# Altium PCB SyncBoard1.PcbDoc (part 2 of 4)
Units mm, origin at the board's own origin, x right, y up, seen from the top; angles counter-clockwise.
Board outline 300 x 250 mm, 2 copper layers (Top Layer, Bottom Layer); 311 components, 299 nets, 1572 pads, 3310 vias.
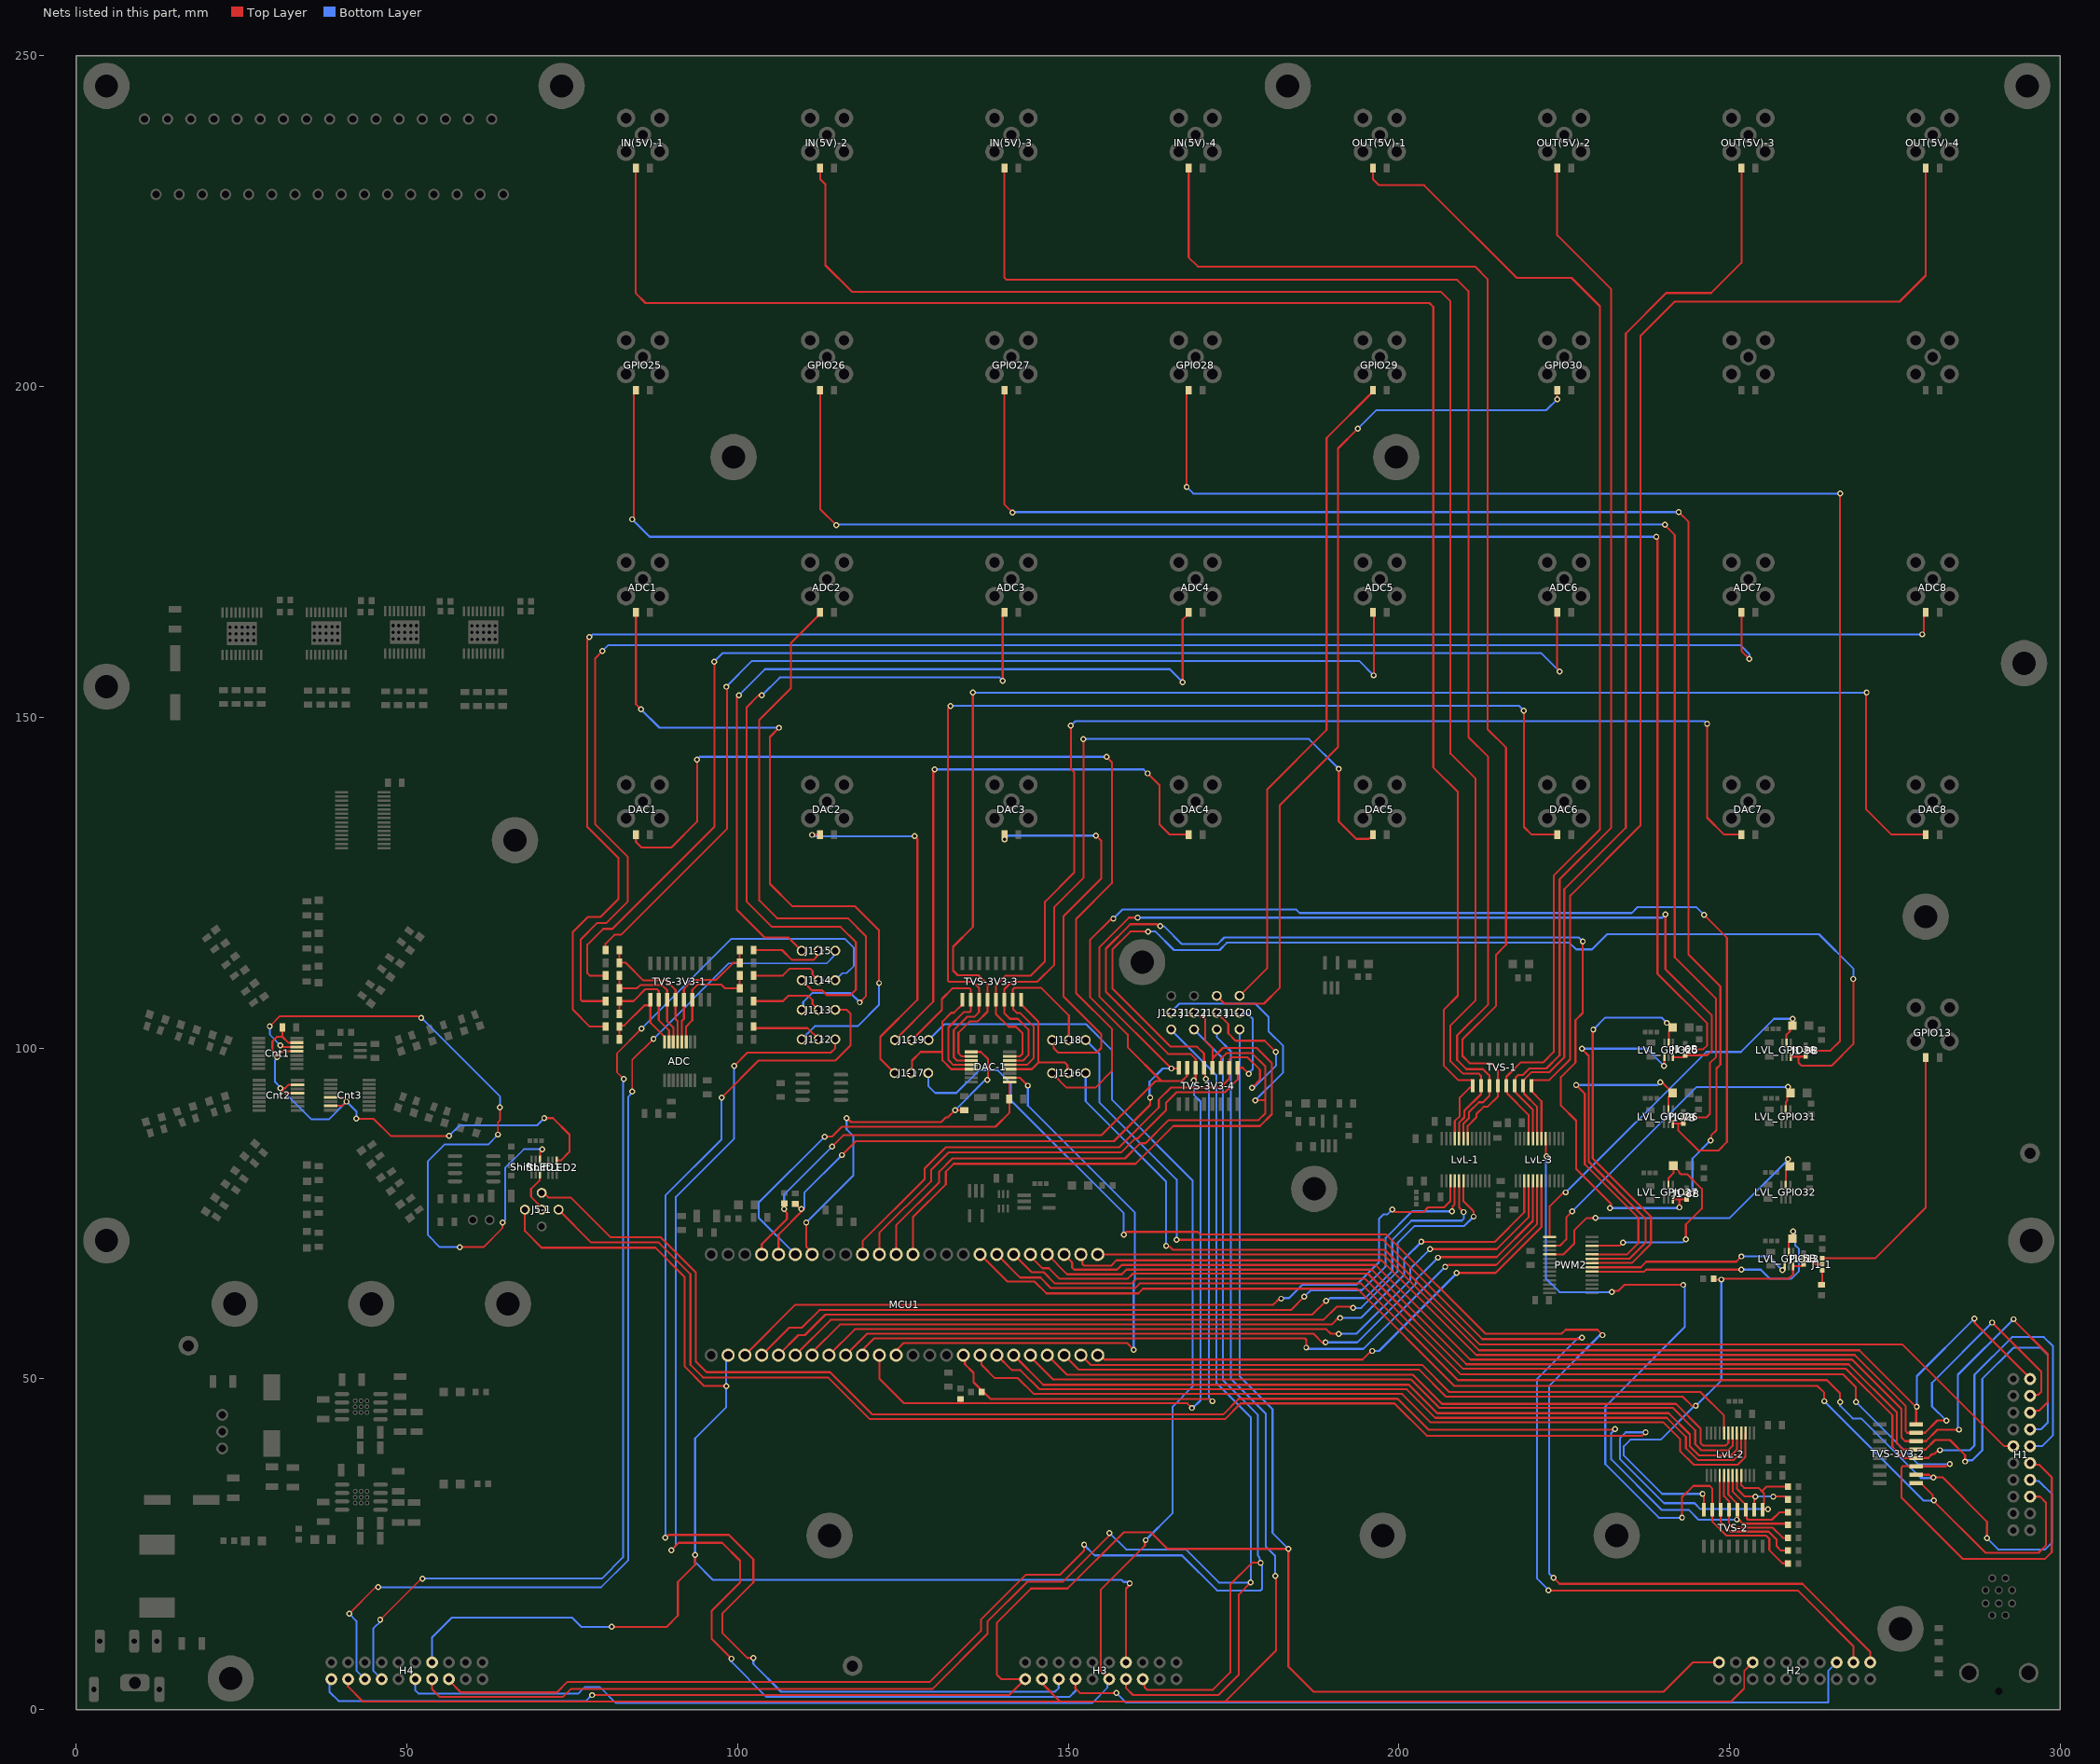
[diagram p2: the nets of this part, all layers, seen from the top]

## Via types
v1: diameter 0.9, hole 0.5, Top Layer to Bottom Layer, tented both sides, 3146 vias
v2: diameter 1.27, hole 0.711, Top Layer to Bottom Layer, tented both sides, 164 vias

## Nets (pads, with @x,y where several pads share a name; then routed paths per layer and width w, separated by ;. In a path a pad name is that pad's centre, name@x,y a point inside that pad or via, vN(x,y) a via of type N, cw(c..) or ccw(c..) an arc to the next point about the centre after c; other vN are vias at no path point) (continued)
AD_3: ADC.3 C5-3.2 R5-3.2 TVS-3V3-1.14 | length 17.9
  Top Layer w0.3: ADC.3@92.246,100.9 92.246,103.246 93.176,104.176 TVS-3V3-1.14@93.176,107.3 93.176,108.776 94,109.6 97.5,109.6 98.086,109.014 C5-3.2@100.346,109.014 R5-3.2@100.346,110.943
AD_4: ADC.4 C5-4.2 R5-4.2 TVS-3V3-1.13 | length 20.1
  Top Layer w0.3: ADC.4@91.596,100.9 91.596,104.096 91.906,104.406 TVS-3V3-1.13@91.906,107.3 91.906,108.906 93.3,110.3 96.8,110.3 99.371,112.871 C5-4.2@100.346,112.871 R5-4.2@100.346,114.8
AD_5: ADC.5 C5-5.2 R5-5.2 TVS-3V3-1.12 | length 20.1
  Top Layer w0.3: R5-5.2@82.146,114.8 C5-5.2@82.146,112.871 83.129,112.871 85.8,110.2 89.2,110.2 90.636,108.764 TVS-3V3-1.12@90.636,107.3 90.636,104.364 90.946,104.054 ADC.5@90.946,100.9
AD_6: ADC.6 C5-6.2 R5-6.2 TVS-3V3-1.11 | length 17.9
  Top Layer w0.3: R5-6.2@82.146,110.943 C5-6.2@82.146,109.014 84.814,109.014 85.3,109.5 88.6,109.5 89.366,108.734 TVS-3V3-1.11@89.366,107.3 89.366,104.034 90.296,103.104 ADC.6@90.296,100.9
AD_7: ADC.7 C5-7.2 R5-7.2 TVS-3V3-1.10 | length 17.1
  Top Layer w0.3: C5-7.2@82.146,105.157 R5-7.2@82.146,107.086 84.286,107.086 86.1,108.9 87.8,108.9 88.096,108.604 TVS-3V3-1.10@88.096,107.3 88.096,104.204 89.646,102.654 ADC.7@89.646,100.9
AD_8: ADC.8 C5-8.2 R5-8.2 TVS-3V3-1.9 | length 15.3
  Top Layer w0.3: C5-8.2@82.146,101.3 R5-8.2@82.146,103.229 82.317,103.4 82.9,103.4 85.95,106.45 86.676,106.45 TVS-3V3-1.9@86.826,106.6 ; TVS-3V3-1.9@86.826,107.3 TVS-3V3-1.9@86.826,106.6 ; ADC.8@88.996,100.9 88.996,101.675 86.826,103.845 TVS-3V3-1.9@86.826,106.6
ADC_1: J1-12.2 R5-1.1 | length 10.6
  Top Layer w0.3: R5-1.1@102.446,103.229 102.675,103 110.6,103 112.246,101.354 J1-12.2@112.246,101.3
ADC_1_E: H2.18 H3.7 J1-12.3 | length 304.2
  Top Layer w0.3: v1(90,24.1) 91.1,25.2 97.7,25.2 100.4,22.5 100.4,19.2 96.1,14.9 96.1,10.7 v1(99.1,7.7) ; v1(99.5,97.3) 101.5,99.3 114.1,99.3 114.786,99.986 J1-12.3@114.786,101.3 ; H3.7@151.12,4.6 151.1,4.58 151.1,3.2 151.8,2.5 v1(157.3,2.5)
  Bottom Layer w0.254: 264.9,5.86 H2.18@266.18,7.14 ; 264.91,3.4 264.91,5.86
  Bottom Layer w0.3: v1(90,24.1) 90.7,24.8 90.7,77.5 99.5,86.3 v1(99.5,97.3) ; v1(99.1,7.7) 99,7.6 99,7.3 104.4,1.9 150.182,1.9 151.12,2.838 H3.7@151.12,4.6 ; v1(157.3,2.5) 158.7,1.1 264.9,1.1 264.9,3.4
ADC_1_S: ADC1.1 J1-12.1 | length 105.7
  Top Layer w0.3: ADC1.1@84.65,165.831 84.65,151.95 v1(85.4,151.2) ; v1(106.3,148.4) 104.9,147 104.9,124.8 108.3,121.4 117.8,121.4 121.4,117.8 v1(121.4,109.8)
  Bottom Layer w0.3: v1(85.4,151.2) 88.2,148.4 v1(106.3,148.4) ; J1-12.1@109.706,101.3 111.706,103.3 118.2,103.3 121.4,106.5 v1(121.4,109.8)
ADC_2: J1-13.2 R5-2.1 | length 11.4
  Top Layer w0.3: R5-2.1@102.446,107.086 106.886,107.086 107.7,107.9 110.7,107.9 111.358,107.242 111.358,106.654 J1-13.2@112.246,105.767
ADC_2_E: H3.8 J1-13.3 | length 184.8
  Top Layer w0.3: v1(89.1,26) 89.176,26 89.576,26.4 98.7,26.4 102.4,22.7 102.4,19.2 97.7,14.5 97.7,11.6 101.5,7.8 v1(102.4,7.8) ; v1(97.6,92.5) 103.2,98.1 114.8,98.1 117.1,100.4 117.1,105.2 116.533,105.767 J1-13.3@114.786,105.767
  Bottom Layer w0.3: v1(89.1,26) 89.1,77.7 97.6,86.2 v1(97.6,92.5) ; v1(102.4,7.8) 102.4,6.9 106.6,2.7 148,2.7 148.55,3.25 148.55,4.57 H3.8@148.58,4.6
ADC_2_S: ADC2.1 J1-13.1 | length 87
  Top Layer w0.3: ADC2.1@112.507,165.831 112.507,165.631 108.1,161.224 108.1,154.4 103.3,149.6 103.3,122.3 106,119.6 116.7,119.6 119.4,116.9 119.4,107.8 v1(118.5,106.9)
  Bottom Layer w0.3: J1-13.1@109.706,105.767 109.936,105.996 109.936,106.936 111.3,108.3 117.1,108.3 v1(118.5,106.9)
ADC_3: J1-14.2 R5-3.1 | length 11.3
  Top Layer w0.3: R5-3.1@102.446,110.943 106.843,110.943 107.9,112 111,112 111.358,111.642 111.358,111.121 J1-14.2@112.246,110.233
ADC_3_E: H4.7 J1-14.3 | length 177.2
  Top Layer w0.254: v1(46,13.6) 52.2,19.8 v1(52.4,19.8) ; v1(82.8,95.3) 81.8,96.3 81.8,99.2 v1(85.5,102.9)
  Bottom Layer w0.254: 44.958,5.827 44.958,12.293 ; 44.993,5.827 H4.7@46.22,4.6 ; 44.993,12.293 46.1,13.4 46.1,13.5 v1(46,13.6) ; v1(52.4,19.8) 79.5,19.8 82.7,23 82.7,95.2 v1(82.8,95.3) ; v1(85.5,102.9) 99.1,116.5 116.2,116.5 117.6,115.1 117.6,112.4 116.5,111.3 115.853,111.3 J1-14.3@114.786,110.233
ADC_3_S: ADC3.1 J1-14.1 | length 116.3
  Top Layer w0.3: v1(103.7,153.3) 103.2,153.3 101.4,151.5 101.4,122.1 105.2,118.3 115.6,118.3 117.9,116 117.9,108.8 117.1,108 113.5,108 112.8,108.7 111.239,108.7 J1-14.1@109.706,110.233 ; v1(140.1,155.5) 140.1,165.566 ADC3.1@140.364,165.831
  Bottom Layer w0.3: v1(103.7,153.3) 106.4,156 139.6,156 v1(140.1,155.5)
ADC_4: J1-15.2 R5-4.1 | length 11.4
  Top Layer w0.3: R5-4.1@102.446,114.8 106.736,114.8 108.236,113.3 111.5,113.3 112.024,113.824 112.024,114.478 J1-15.2@112.246,114.7
ADC_4_E: H4.8 J1-15.3 | length 170.2
  Top Layer w0.254: v1(41.3,14.5) 45.3,18.5 v1(45.7,18.5) ; v1(84.1,93.4) 84.1,98.2 v1(87.3,101.4)
  Bottom Layer w0.254: v1(41.3,14.5) 42.4,13.4 42.4,5.88 H4.8@43.68,4.6 ; v1(45.7,18.5) 79.4,18.5 83.5,22.6 83.5,88.6 83.5,92.645 84.1,93.245 v1(84.1,93.4) ; v1(87.3,101.4) 98.7,112.8 113.5,112.8 114.548,113.848 114.548,114.462 J1-15.3@114.786,114.7
ADC_4_S: ADC4.1 J1-15.1 | length 125.4
  Top Layer w0.3: v1(100.2,153.3) 99.9,153 99.9,120.9 104.1,116.7 107.706,116.7 J1-15.1@109.706,114.7 ; v1(167.3,155.3) 167.3,164.709 168.221,165.631 ADC4.1@168.221,165.831
  Bottom Layer w0.3: v1(100.2,153.3) 104.15,157.25 165.35,157.25 v1(167.3,155.3)
ADC_5: ADC5.1 R5-5.1 | length 158
  Top Layer w0.3: R5-5.1@80.046,114.8 80.046,115.746 81.4,117.1 82.4,117.1 98.4,133.1 98.4,154.5 v1(98.3,154.6) ; ADC5.1@196.079,165.831 196.2,165.709 v1(196.2,156.3)
  Bottom Layer w0.3: v1(98.3,154.6) 102.2,158.5 194,158.5 v1(196.2,156.3)
ADC_6: ADC6.1 R5-6.1 | length 197.3
  Top Layer w0.3: R5-6.1@80.046,110.943 77.657,110.943 77.3,111.3 77.3,115.6 79.7,118 81.1,118 96.5,133.4 v1(96.5,158.4) ; ADC6.1@223.936,165.831 223.936,157.427 224.3,157.062 v1(224.3,156.9)
  Bottom Layer w0.3: v1(96.5,158.4) 97.8,159.7 221.5,159.7 v1(224.3,156.9)
ADC_7: ADC7.1 R5-7.1 | length 245.4
  Top Layer w0.3: v1(79.6,160) 78.5,158.9 78.5,133.8 83.4,128.9 83.4,122.1 80.2,118.9 78.8,118.9 76.314,116.414 76.314,107.261 76.49,107.086 R5-7.1@80.046,107.086 ; ADC7.1@251.793,165.831 251.793,160.007 v1(253,158.8)
  Bottom Layer w0.3: v1(79.6,160) 80.5,160.9 251.6,160.9 253,159.5 v1(253,158.8)
ADC_8: ADC8.1 R5-8.1 | length 273.6
  Top Layer w0.3: v1(77.6,162.1) 77.3,161.8 77.3,133.4 82,128.7 82,122.5 79.3,119.8 77.4,119.8 75.1,117.5 75.1,105.8 77.671,103.229 R5-8.1@80.046,103.229 ; v1(279.1,162.5) 279.1,162.662 279.35,162.912 279.35,165.531 ADC8.1@279.65,165.831
  Bottom Layer w0.3: v1(77.6,162.1) 77.676,162.1 78.076,162.5 v1(279.1,162.5)
Ain0: GPIO29.1 J1-20.3 | length 99.9
  Top Layer w0.3: J1-20.3@175.913,107.88 180.1,112.067 180.1,139.1 189.066,148.066 189.066,192.202 196.079,199.215 GPIO29.1@196.079,199.415
Ain1: GPIO30.1 J1-21.3 | length 133.8
  Top Layer w0.3: J1-21.3@172.468,107.88 173.648,106.7 179.6,106.7 182,109.1 182,136.7 190.8,145.5 190.8,190.6 v1(193.8,193.6) ; v1(223.936,198.036) GPIO30.1@223.936,199.415
  Bottom Layer w0.3: v1(193.8,193.6) 196.6,196.4 222.3,196.4 v1(223.936,198.036)
Cnt_In: J5-1.1 ShiftLED1.3 | length 6.6
  Top Layer w0.3: ShiftLED1.3@70.15,80.9 70.125,80.875 70.125,80.025 68.8,78.7 68.8,77.5 J5-1.1@70.7,75.6
Cnt_Reset: Cnt1.13 Cnt1.15 Cnt2.13 Cnt2.15 Cnt3.13 Cnt3.15 R1-32.1 ShiftLED2.4 | length 84.7
  Top Layer w0.3: v1(30.389,98.611) v1@30.389,98.911 ; R1-32.1@31.2,103.1 31.2,101.7 ; Cnt1.13@33.4,99.5 31.2,99.5 30.611,98.911 v1@30.389,98.911 ; Cnt1.15@33.4,100.8 32.1,100.8 31.2,101.7 ; Cnt2.13@33.5,93.15 31.65,93.15 v1(30.9,93.9) 31.6,93.9 32.15,94.45 Cnt2.15@33.5,94.45 ; Cnt3.15@38.5,91.25 40.25,91.25 v1(40.9,91.9) 40.25,92.55 Cnt3.13@38.5,92.55 ; v1(42.4,89.3) 45,89.3 47.6,86.7 v1(56.4,86.7) ; v1(70.8,89.4) 72.1,89.4 74.6,86.9 74.6,84.3 73.3,83 ShiftLED2.4@72.7,83 ; v1@30.389,98.911 29.7,99.6 29.7,101 30.4,101.7 31.2,101.7
  Bottom Layer w0.3: v1(30.389,98.611) 30.389,98.448 30.1,98.159 30.1,94.862 30.9,94.062 v1(30.9,93.9) 35.6,89.2 38.2,89.2 v1(40.9,91.9) 42.4,90.4 v1(42.4,89.3) ; v1(56.4,86.7) 58,88.3 69.7,88.3 v1(70.8,89.4)
Count: Cnt1.14 ShiftLED1.4 | length 107
  Top Layer w0.254: v1(29.3,103.3) 30.8,104.8 51.7,104.8 v1@52.2,104.3 ; v1(30.9,100.4) 31.075,100.4 31.325,100.15 Cnt1.14@33.4,100.15 ; v1(58,69.9) 61.6,69.9 64.469,72.769 64.469,73.569 v1(64.5,73.6) ; v1(63.8,86.9) 63.8,88.738 64.1,89.038 v1(64.1,91) ; ShiftLED1.4@70.15,83.1 70.15,84.35 v1(70.5,84.7)
  Bottom Layer w0.254: v1(29.3,103.3) 29.3,102 v1(30.9,100.4) ; v1@52.2,104.3 52.3,104.2 52.6,104.2 64.1,92.7 v1(64.1,91) ; v1(58,69.9) 55,69.9 53.2,71.7 53.2,82.9 55.7,85.4 62.3,85.4 v1(63.8,86.9) ; v1(64.5,73.6) 64.9,74 64.9,81.9 67.7,84.7 v1(70.5,84.7)
  other v1: 52.2,104.55
CS0: DAC-1.2 MCU1.11 | length 87.5
  Top Layer w0.3: MCU1.11@123.986,53.56 124.311,53.885 124.311,54.611 125.1,55.4 158.9,55.4 v1(159.9,54.4) ; DAC-1.2@141.146,95.5 142.7,95.5 v1(143.9,94.3)
  Bottom Layer w0.3: v1(143.9,94.3) 143.9,91.3 160.1,75.1 160.1,64.981 159.9,64.781 v1(159.9,54.4)
CS1: H3.17 H4.17 J5-1.5 MCU1.1 | length 217.6
  Top Layer w0.3: J5-1.5@67.86,75.56 67.86,72.34 70.39,69.81 87.59,69.81 91.99,65.41 91.99,51.89 94.98,48.9 v1(98.3,48.9) ; v1(81,12.5) 89.3,12.5 91,14.2 91,19.3 93.6,21.9 v1(93.6,23.4) ; H3.17@158.74,7.14 158.74,18.278 159.3,18.838 v1(159.3,19.1)
  Bottom Layer w0.3: H4.17@53.84,7.14 53.84,10.94 56.8,13.9 75,13.9 76.4,12.5 v1(81,12.5) ; MCU1.1@98.586,53.56 98.3,53.274 v1(98.3,48.9) 98.3,45.7 93.6,41 93.6,22.3 96.3,19.6 158.065,19.6 158.379,19.286 159.114,19.286 v1(159.3,19.1)
D0: IN(5V)-1.1 LvL-1.21 TVS-1.9 | length 272.8
  Top Layer w0.3: 84.65,233 84.6,232.95 84.6,214.1 86.1,212.6 204.6,212.6 205.2,212 205.2,142.4 208.9,138.7 208.9,107.9 206.8,105.8 206.8,97.3 208.95,95.15 211,95.15 211.15,95 TVS-1.9@211.15,94.3 211.15,94.15 211,94 210.7,94 209.2,92.5 209.2,89.7 208.45,88.95 LvL-1.21@208.45,86.3
d0*: LvL-1.3 MCU1.2 | length 122.8
  Top Layer w0.3: MCU1.2@101.126,53.56 108.766,61.2 181,61.2 181.583,61.783 181.62,61.783 181.927,62.09 v1@181.927,62.127 ; v1(198.98,75.57) 199.086,75.57 199.456,75.2 203.7,75.2 204.4,75.9 206.8,75.9 207.8,76.9 LvL-1.3@207.8,79.9
  Bottom Layer w0.3: v1@182.6,62.2 183.4,62.2 185.4,64.2 193.6,64.2 197,67.6 197,74.2 197.628,74.828 198.238,74.828 v1(198.98,75.57)
  other v1: 182.2,62.1
D1: IN(5V)-2.1 LvL-1.20 TVS-1.10 | length 246.2
  Top Layer w0.3: 112.507,233 112.507,231.293 113.3,230.5 113.3,218.3 117.3,214.3 206.348,214.3 207.8,212.848 207.8,144.5 211.6,140.7 211.6,107.2 207.8,103.4 207.8,98 209.7,96.1 212.1,96.1 212.42,95.78 TVS-1.10@212.42,94.3 212.42,93.02 209.9,90.5 209.9,89.5 209.1,88.7 LvL-1.20@209.1,86.3
d1*: LvL-1.4 MCU1.3 | length 120.6
  Top Layer w0.3: MCU1.3@103.666,53.56 107.806,57.7 109.7,57.7 112.389,60.389 183.689,60.389 v1(185.7,62.4) ; v1(208,75.3) 208.115,75.415 208.115,76.04 208.425,76.35 208.425,79.875 LvL-1.4@208.45,79.9
  Bottom Layer w0.3: v1(185.7,62.4) 186.7,63.4 194.4,63.4 198,67 198,71.3 202,75.3 v1(208,75.3)
D2: IN(5V)-3.1 LvL-1.19 TVS-1.11 | length 224.4
  Top Layer w0.3: 140.364,233 140.364,216.4 140.664,216.1 208.8,216.1 210.5,214.4 210.5,147 213.5,144 213.5,106.6 208.8,101.9 208.8,98.2 210.2,96.8 212.7,96.8 213.69,95.81 TVS-1.11@213.69,94.3 213.69,92.79 212.7,91.8 212.1,91.8 210.6,90.3 210.6,89.4 209.75,88.55 LvL-1.19@209.75,86.3 LvL-1.19@209.725,86.325
d2*: LvL-1.5 MCU1.4 | length 120.9
  Top Layer w0.3: MCU1.4@106.206,53.56 106.206,53.606 109.2,56.6 110.2,56.6 113.3,59.7 186.9,59.7 v1(189,61.8) ; LvL-1.5@209.1,79.9 209.1,75.9 v1(209.8,75.2)
  Bottom Layer w0.3: v1(189,61.8) 189.2,61.8 189.6,62.2 194.9,62.2 199,66.3 199,71 201.9,73.9 209.5,73.9 209.8,74.2 v1(209.8,75.2)
D3: IN(5V)-4.1 LvL-1.18 TVS-1.12 | length 200.1
  Top Layer w0.3: 168.221,233 168.221,219.479 169.6,218.1 211.5,218.1 213.4,216.2 213.4,148.2 216.2,145.4 216.2,115.6 214.7,114.1 214.7,106.4 209.6,101.3 209.6,98.8 210.7,97.7 213.8,97.7 214.96,96.54 TVS-1.12@214.96,94.3 214.96,92.66 213.4,91.1 212.8,91.1 211.7,90 211.7,89.5 210.4,88.2 LvL-1.18@210.4,86.3
d3*: LvL-1.6 MCU1.5 | length 120
  Top Layer w0.3: MCU1.5@108.746,53.56 114.086,58.9 188.6,58.9 190.6,60.9 192.9,60.9 v1(193.1,60.7) ; LvL-1.6@209.75,79.9 209.75,76.85 211.3,75.3 v1(211.3,74.5)
  Bottom Layer w0.3: v1(193.1,60.7) 194.3,60.7 199.8,66.2 199.8,70.5 202.4,73.1 209.9,73.1 v1(211.3,74.5)
D4: LvL-3.21 OUT(5V)-1.1 TVS-1.13 | length 179
  Top Layer w0.3: 196.079,233 196.079,231.321 197,230.4 203.8,230.4 217.8,216.4 226.1,216.4 230.4,212.1 230.4,133.021 223.4,126.021 223.4,99.4 221.8,97.8 218.4,97.8 216.23,95.63 TVS-1.13@216.23,94.3 216.38,94.15 216.38,93.12 219.6,89.9 LvL-3.21@219.6,86.3
d4*: LvL-3.3 MCU1.6 | length 123
  Top Layer w0.3: MCU1.6@111.286,53.56 111.286,53.986 115.5,58.2 189.839,58.2 190.839,59.2 v1(191.1,59.2) ; v1(203.4,70.7) 214.5,70.7 218.95,75.15 LvL-3.3@218.95,79.9
  Bottom Layer w0.3: v1(191.1,59.2) 194.3,59.2 200.8,65.7 200.8,68.1 v1(203.4,70.7)
D5: LvL-3.20 OUT(5V)-2.1 TVS-1.14 | length 159.2
  Top Layer w0.3: LvL-3.20@220.25,86.3 220.25,90.65 217.65,93.25 217.65,94.15 TVS-1.14@217.5,94.3 217.65,94.45 217.65,95.55 218,95.9 218.7,95.9 219.7,96.9 222.3,96.9 224.3,98.9 224.3,125.5 232.1,133.3 232.1,214.676 223.936,222.84 223.936,233
d5*: LvL-3.4 MCU1.7 | length 121.5
  Top Layer w0.3: MCU1.7@113.826,53.56 117.766,57.5 189,57.5 189.7,56.8 v1(190.9,56.8) ; v1(204.7,69.6) 214.8,69.6 219.6,74.4 LvL-3.4@219.6,79.9
  Bottom Layer w0.3: v1(190.9,56.8) 193.6,56.8 201.7,64.9 201.7,66.6 203.493,68.393 v1(204.7,69.6)
D6: LvL-3.19 OUT(5V)-3.1 TVS-1.15 | length 166.8
  Top Layer w0.3: LvL-3.19@220.9,86.3 220.9,91.1 218.903,93.097 218.903,94.167 TVS-1.15@218.77,94.3 218.77,95 219.1,95.33 219.1,95.4 220.014,96.314 222.714,96.314 225,98.6 225,124 234.3,133.3 234.3,208 240.4,214.1 247.2,214.1 251.793,218.693 251.793,233
d6*: LvL-3.5 MCU1.8 | length 119.9
  Top Layer w0.3: MCU1.8@116.366,53.56 119.606,56.8 187.1,56.8 188.526,55.374 188.774,55.374 v1(188.9,55.5) ; v1(205.9,68.3) 206,68.4 214.8,68.4 220.25,73.85 LvL-3.5@220.25,79.9
  Bottom Layer w0.3: v1(188.9,55.5) 193.7,55.5 202.6,64.4 202.6,65 204.543,66.943 v1(205.9,68.3)
D7: LvL-3.18 OUT(5V)-4.1 TVS-1.16 | length 193.4
  Top Layer w0.3: LvL-3.18@221.55,86.3 221.55,91.95 220.19,93.31 220.19,94.15 TVS-1.16@220.04,94.3 220.04,95 220.19,95.15 222.75,95.15 225.9,98.3 225.9,123 236.5,133.6 236.5,207.6 241.7,212.8 275.7,212.8 279.65,216.75 279.65,233
d7*: LvL-3.6 MCU1.9 | length 119.2
  Top Layer w0.3: MCU1.9@118.906,53.56 119.228,53.882 119.228,54.688 120.64,56.1 185.8,56.1 186,55.9 v1(186,54.7) ; v1(207,66.9) 207.162,66.9 207.462,67.2 214.7,67.2 220.9,73.4 LvL-3.6@220.9,79.9
  Bottom Layer w0.3: v1(186,54.7) 186.185,54.515 194.615,54.515 v1(207,66.9)
D8: F1.2 J5-1.3 LvL-2.21 TVS-2.9 | length 234.5
  Top Layer w0.3: J5-1.3@72.94,75.56 77.9,70.6 88.09,70.6 92.9,65.79 92.9,52.1 94.8,50.2 113.7,50.2 120,43.9 173.7,43.9 176.07,46.27 199.33,46.27 204.2,41.4 236.8,41.4 v1(237.3,41.9) ; LvL-2.21@251.75,35.4 251.75,33.95 252.2,33.5 254.4,33.5 254.9,33 ; TVS-2.9@254.98,30.2 TVS-2.9@255.08,30.3 ; v1(255.8,30.3) TVS-2.9@255.08,30.3 ; F1.2@258.8,33.7 255.6,33.7 254.9,33 ; 254.9,33 255.2,32.7 255.2,31.226 255.13,31.156 255.13,30.35 TVS-2.9@255.08,30.3
  Bottom Layer w0.3: v1(237.3,41.9) 234.3,41.9 233.4,41 233.4,37.9 240.1,31.2 244.7,31.2 245.6,30.3 v1(255.8,30.3)
d8*: LvL-2.3 MCU1.16 | length 128.5
  Top Layer w0.3: MCU1.16@136.686,53.56 136.89,53.356 136.89,52.11 138.9,50.1 142.4,50.1 144.8,47.7 200.5,47.7 204.8,43.4 240,43.4 242.5,40.9 242.5,39.1 244.6,37 251.2,37 252.4,38.2 LvL-2.3@252.4,41.8
D9: F2.2 LvL-2.20 TVS-2.10 | length 12.8
  Top Layer w0.3: LvL-2.20@251.1,35.4 251.1,33.4 252.3,32.2 v1(253.9,32.2) 253.71,32.01 TVS-2.10@253.71,30.9 ; TVS-2.10@253.56,31.05 TVS-2.10@253.71,30.9 ; TVS-2.10@253.71,30.2 TVS-2.10@253.71,30.9 ; TVS-2.10@253.71,30.79 TVS-2.10@253.71,30.9 ; v1(256.6,32.2) 258.367,32.2 258.45,32.117 258.5,32.117 258.8,31.817 F2.2@258.8,31.767
  Bottom Layer w0.3: v1(253.9,32.2) v1(256.6,32.2)
d9*: LvL-2.4 MCU1.17 | length 123.5
  Top Layer w0.3: MCU1.17@139.226,53.56 141.486,51.3 142.8,51.3 145.7,48.4 201.2,48.4 205.5,44.1 240.5,44.1 243.4,41.2 243.4,39.5 245.2,37.7 250.6,37.7 251.75,38.85 LvL-2.4@251.75,41.8
D10: F3.2 LvL-2.19 TVS-2.11 | length 14.1
  Top Layer w0.3: LvL-2.19@250.45,35.4 250.45,32.95 252.29,31.11 252.29,30.35 TVS-2.11@252.44,30.2 252.59,30.05 252.59,28.91 252.8,28.7 256.4,28.7 257.533,29.833 F3.2@258.8,29.833
d10*: LvL-2.5 MCU1.18 | length 119.5
  Top Layer w0.3: MCU1.18@141.766,53.56 146.226,49.1 201.5,49.1 205.8,44.8 240.8,44.8 244,41.6 244,39.8 245.4,38.4 250.2,38.4 251.1,39.3 LvL-2.5@251.1,41.8
D11: F4.2 J5-1.2 LvL-2.18 TVS-2.12 | length 230
  Top Layer w0.3: J5-1.2@70.4,78.1 70.697,78.1 71.397,77.4 74.8,77.4 80.79,71.41 88.35,71.41 93.7,66.06 93.7,52.63 95.33,51 114,51 120.4,44.6 173.411,44.6 175.791,46.98 199.82,46.98 204.5,42.3 232.6,42.3 v1(232.7,42.4) ; LvL-2.18@249.8,35.4 249.8,32.5 251.02,31.28 251.02,30.35 TVS-2.12@251.17,30.2 251.32,30.05 v1@251.32,28.78 ; v1(251.1,28.7) 251.18,28.78 v1@251.32,28.78 ; F4.2@258.8,27.9 258.6,28.1 252,28.1 v1@251.32,28.78
  Bottom Layer w0.3: v1(232.7,42.4) 232.1,41.8 232.1,37.8 239.7,30.2 243.8,30.2 245.3,28.7 v1(251.1,28.7)
d11*: LvL-2.6 MCU1.19 | length 115.7
  Top Layer w0.3: MCU1.19@144.306,53.56 144.306,53.294 147.7,49.9 201.8,49.9 206.1,45.6 241.4,45.6 244.8,42.2 244.8,40.1 245.7,39.2 249.8,39.2 250.45,39.85 LvL-2.6@250.45,41.8
D12: F5.2 LvL-2.17 TVS-2.13 | length 17.4
  Top Layer w0.3: LvL-2.17@249.15,35.4 249.15,32.25 249.9,31.5 TVS-2.13@249.9,30.2 249.9,28.1 250.5,27.5 256.5,27.5 258.033,25.967 F5.2@258.8,25.967
d12*: LvL-2.7 MCU1.20 | length 111.6
  Top Layer w0.3: MCU1.20@146.846,53.56 149.806,50.6 202.1,50.6 206.5,46.2 241.9,46.2 245.6,42.5 245.6,40.3 246,39.9 249.4,39.9 249.8,40.3 LvL-2.7@249.8,41.8
D13: J1-1.2 J1-5B.2 | length 3.2
  Top Layer w0.3: J1-5B.2@261.2,68.2 262.1,68.2 262.901,67.399 263,67.3 J1-1.2@264,67.3
d13*: J1-5B.3 LVL_GPIO13.3 MCU1.21 R1-35.1 TVS-2.16 | length 166.3
  Top Layer w0.3: MCU1.21@149.386,53.56 151.546,51.4 203,51.4 207.1,47.3 242.9,47.3 244.3,45.9 v1(244.9,45.9) ; v1(245.9,32.6) 246.09,32.41 TVS-2.16@246.09,30.2 ; R1-35.1@247.58,65.12 247.71,64.99 v1(248.75,64.99) 248.865,65.105 249.216,65.105 249.226,65.115 258.915,65.115 259.6,65.8 LVL_GPIO13.3@259.6,67 260.9,67 J1-5B.3@261.2,67.3
  Bottom Layer w0.3: v1(245.9,32.6) 239.8,32.6 234,38.4 234,39.8 235,40.8 239.6,40.8 244.7,45.9 v1(244.9,45.9) 248.75,49.75 v1(248.75,64.99)
D13_Out: GPIO13.1 J1-1.3 | length 41.5
  Top Layer w0.3: J1-1.3@264,68.2 272,68.2 279.65,75.85 GPIO13.1@279.65,98.55
D14: F7.2 LvL-2.16 TVS-2.14 | length 19.6
  Top Layer w0.3: LvL-2.16@248.5,35.4 248.525,35.375 248.525,30.305 TVS-2.14@248.63,30.2 248.63,28.37 250.1,26.9 255.9,26.9 257.1,25.7 257.1,24.7 257.767,24.033 F7.2@258.8,24.033
d14*: LvL-2.8 MCU1.22 | length 103.6
  Top Layer w0.3: MCU1.22@151.926,53.56 153.386,52.1 203.5,52.1 207.6,48 245.6,48 249.15,44.45 LvL-2.8@249.15,41.8
D15: F8.2 LvL-3.17 TVS-2.15 | length 119.5
  Top Layer w0.3: LvL-3.17@222.2,86.3 222.225,86.275 222.225,83.675 v1(222.3,83.6) ; v1(232.2,63.1) 232.4,63.3 233.2,63.3 234.1,64.2 v1(243,64.2) ; v1(242.8,29) 242.8,32.1 244.5,33.8 247,33.8 247.36,33.44 TVS-2.15@247.36,30.2 247.36,28.44 249.5,26.3 255.5,26.3 256,25.8 256,24.1 258,22.1 F8.2@258.8,22.1 258.8,22.15 258.5,22.45 F8.2@258.45,22.45
  Bottom Layer w0.3: v1(222.3,83.6) 222.2,83.5 222.2,65.2 224.3,63.1 v1(232.2,63.1) ; v1(242.8,29) 239.3,29 231.2,37.1 231.2,45.8 243.2,57.8 243.2,64 v1(243,64.2)
d15*: LvL-3.7 MCU1.23 | length 82.7
  Top Layer w0.3: MCU1.23@154.466,53.56 154.832,53.56 155.492,52.9 194.5,52.9 195.5,53.9 195.7,53.9 v1(196,54.2) ; v1(208.7,66) 214.6,66 221.55,72.95 LvL-3.7@221.55,79.9
  Bottom Layer w0.3: v1(196,54.2) 197,54.2 208.7,65.9 v1(208.7,66)
d16: H1.1 MCU1.24 TVS-3V3-2.16 | length 165.4
  Top Layer w0.3: MCU1.24@154.466,68.8 197.6,68.8 212.1,54.3 269.6,54.3 278.2,45.7 TVS-3V3-2.16@278.2,43.11 ; v1(287,59.1) 287,58.5 295.421,50.079 H1.1@295.421,49.963
  Bottom Layer w0.3: v1(278.3,45.8) 278.3,50.4 v1(287,59.1)
d17: H1.2 MCU1.25 TVS-3V3-2.15 | length 181.4
  Top Layer w0.3: MCU1.25@151.926,68.8 152.15,68.576 152.15,67.35 152.4,67.1 156.5,67.1 157.3,67.9 197.4,67.9 211.7,53.6 268.9,53.6 276.6,45.9 276.6,42.1 276.86,41.84 TVS-3V3-2.15@278.2,41.84 279.54,41.84 281.4,43.7 282.781,43.7 v1(282.755,43.674) ; v1(289.7,58.5) 297.1,51.1 297.1,48 296.7,47.6 295.598,47.6 H1.2@295.421,47.423
  Bottom Layer w0.3: v1(282.755,43.674) 280.6,45.828 280.6,49.4 v1(289.7,58.5)
d18: H1.3 MCU1.26 TVS-3V3-2.14 | length 189.5
  Top Layer w0.3: MCU1.26@149.386,68.8 150.6,67.586 150.6,66.8 150.9,66.5 157.4,66.5 158.1,67.2 196.482,67.2 210.782,52.9 268.5,52.9 276,45.4 276,41.1 276.53,40.57 TVS-3V3-2.14@278.2,40.57 279.67,40.57 281.4,42.3 v1(284.7,42.3) ; v1(292.9,59) 292.9,58.9 298.1,53.7 298.1,46.5 296.77,45.17 295.708,45.17 H1.3@295.421,44.883
  Bottom Layer w0.3: v1(284.7,42.3) 284.514,42.486 284.514,42.946 284.5,42.961 284.5,50.6 v1(292.9,59)
d19: H1.4 MCU1.27 TVS-3V3-2.13 | length 196.5
  Top Layer w0.3: MCU1.27@146.846,68.8 149.846,65.8 158.1,65.8 158.8,66.5 195.9,66.5 210.2,52.2 268,52.2 275.3,44.9 275.3,40.2 276.2,39.3 TVS-3V3-2.13@278.2,39.3 279.6,39.3 281.053,40.753 283.296,40.753 285.6,38.449 v1(285.6,37.5)
  Bottom Layer w0.3: v1(285.6,37.5) 285.785,37.685 286.685,37.685 288.2,39.2 288.2,50 292.9,54.7 297,54.7 298.1,53.6 298.1,43.4 297.043,42.343 H1.4@295.421,42.343
d20: H1.5 MCU1.28 TVS-3V3-2.12 | length 203
  Top Layer w0.3: MCU1.28@144.306,68.8 144.306,68.494 146.1,66.7 147.1,66.7 148.7,65.1 159,65.1 159.8,65.9 195.3,65.9 209.7,51.5 267.6,51.5 274.6,44.5 274.6,39.7 276.27,38.03 TVS-3V3-2.12@278.2,38.03 280.03,38.03 280.627,38.627 280.964,38.627 281.538,39.2 v1(281.8,39.2)
  Bottom Layer w0.3: v1(281.8,39.2) 286.3,39.2 287,39.9 287,50.6 292.7,56.3 297.5,56.3 298.9,54.9 298.9,41.5 297.203,39.803 H1.5@295.421,39.803
d21: H1.6 MCU1.29 TVS-3V3-2.11 | length 211.1
  Top Layer w0.3: MCU1.29@141.766,68.8 144.466,66.1 146.3,66.1 148,64.4 159.6,64.4 160.3,65.1 194.9,65.1 209.3,50.7 267.1,50.7 269.1,48.7 v1(269.1,46.5) ; v1(283.3,37.1) 283.038,37.1 282.698,36.76 TVS-3V3-2.11@278.2,36.76 278.16,36.8 276.2,36.8 276,36.6 276,32 285.2,22.8 297.7,22.8 298.7,23.8 298.7,35.1 296.771,37.029 295.655,37.029 H1.6@295.421,37.263
  Bottom Layer w0.3: v1(269.1,46.5) 278.5,37.1 v1(283.3,37.1)
d22: H1.7 MCU1.30 TVS-3V3-2.10 | length 195.9
  Top Layer w0.3: MCU1.30@139.226,68.8 142.726,65.3 145.8,65.3 147.4,63.7 160.1,63.7 160.8,64.4 194.3,64.4 208.9,49.8 264.7,49.8 266.7,47.8 v1(266.7,46.5) ; TVS-3V3-2.10@278.2,35.49 280.148,35.49 280.538,35.1 v1(280.8,35.1) 282.2,35.1 288.9,28.4 v1(288.9,25.9)
  Bottom Layer w0.3: v1(266.7,46.5) 266.7,45.9 268.6,44 269.9,44 278.9,35 280.7,35 v1(280.8,35.1) ; v1(288.9,25.9) 290.6,24.2 297.7,24.2 298.7,25.2 298.7,32.6 296.771,34.529 295.615,34.529 H1.7@295.421,34.723
d23: H1.8 MCU1.31 TVS-3V3-2.9 | length 195
  Top Layer w0.3: MCU1.31@136.686,68.8 140.786,64.7 144.9,64.7 146.7,62.9 160.6,62.9 161.3,63.6 193.7,63.6 208.4,48.9 263.3,48.9 264.3,47.9 v1(264.3,46.6) ; TVS-3V3-2.9@278.2,34.22 278.9,34.22 280.714,32.406 280.714,31.786 v1(280.9,31.6) 280.9,31.5 288.7,23.7 296.7,23.7 297.8,24.8 297.8,31.3 296.917,32.183 H1.8@295.421,32.183
  Bottom Layer w0.3: v1(264.3,46.6) 279.3,31.6 v1(280.9,31.6)
D25: GPIO25.1 J1-6B.2 | length 259.3
  Top Layer w0.3: v1(84.1,179.9) 84.1,180.062 84.35,180.312 84.35,199.115 GPIO25.1@84.65,199.415 ; v1(238.921,177.262) 239.1,177.083 239.1,111.2 246.61,103.69 246.61,100.41 246,99.8 J1-6B.2@243.3,99.8
  Bottom Layer w0.3: v1(84.1,179.9) 86.738,177.262 v1(238.921,177.262)
d25*: J1-6B.3 LVL_GPIO25.3 MCU1.43 R1-36.1 TVS-3V3-4.16 | length 219.1
  Top Layer w0.3: MCU1.43@106.206,68.8 106.206,71.806 110.025,75.625 v1@110.1,75.7 ; R1-36.1@108.74,76.42 108.79,76.42 109.53,75.68 v1(109.68,75.68) ; v1(115.8,83.8) 117.9,85.9 156.9,85.9 162.4,91.4 v1(162.4,92.5) ; v1(160.5,119.7) 159.2,119.7 154.7,115.2 154.7,107.8 v1(165.6,96.9) 166.636,96.9 TVS-3V3-4.16@166.736,97 ; v1(240.3,120.2) 240.3,111.9 247.327,104.873 247.327,99.627 246.6,98.9 J1-6B.3@243.3,98.9 243,98.6 LVL_GPIO25.3@241.45,98.6
  Bottom Layer w0.3: v1@110.1,75.7 110.1,78.1 v1(115.8,83.8) ; v1(160.5,119.7) 239.8,119.7 v1(240.3,120.2) ; v1(162.4,92.5) 162.3,92.6 162.3,94.9 164.3,96.9 v1(165.6,96.9)
D26: GPIO26.1 J1-7B.2 | length 243.6
  Top Layer w0.3: GPIO26.1@112.507,199.415 112.507,181.435 v1(114.933,179.009) ; v1(240.2,179.1) 240.2,179.024 241.7,177.524 241.7,113.7 247.949,107.451 247.949,98.649 247,97.7 247,90 246.5,89.5 J1-7B.2@243,89.5
  Bottom Layer w0.3: v1(114.933,179.009) 115.024,179.1 v1(240.2,179.1)
d26*: J1-7B.3 LVL_GPIO26.3 MCU1.44 R1-37.1 TVS-3V3-4.15 | length 250.5
  Top Layer w0.3: MCU1.44@103.666,68.8 103.666,70.336 107.48,74.15 107.48,75.048 107.06,75.468 107.06,76.46 R1-37.1@107.09,76.49 ; v1(114.3,85.1) 116,86.8 155,86.8 163.2,95 164.1,95 ; v1(156.833,119.557) 156.557,119.557 153.3,116.3 153.3,107.7 159,102 159,100.1 164.1,95 ; TVS-3V3-4.15@168.006,97 167.935,96.929 167.935,95.735 167.2,95 164.1,95 ; LVL_GPIO26.3@241.4,88.5 241.4,88.575 241.425,88.6 242.213,88.6 ; J1-7B.3@243,88.6 242.213,88.6 ; v1(246.118,120.123) 249.6,116.641 249.6,85.8 248.3,84.5 245.3,84.5 242.213,87.587 242.213,88.6
  Bottom Layer w0.3: v1(107.06,75.63) 107.06,77.86 v1(114.3,85.1) ; v1(156.833,119.557) 158.176,120.9 184.5,120.9 185,120.4 235.2,120.4 236.1,121.3 244.941,121.3 v1(246.118,120.123)
D27: GPIO27.1 J1-8B.2 | length 228
  Top Layer w0.3: GPIO27.1@140.364,199.415 140.364,182.136 v1(141.6,180.9) ; v1(242.3,181) 243.8,179.5 243.8,114.1 248.6,109.3 248.6,97.5 248,96.9 248,87.581 247.215,86.796 247.215,86.115 v1(247.1,86) ; J1-8B.2@243.5,78 243.509,78.009 244.374,78.009 v1(244.382,78.017)
  Bottom Layer w0.3: v1(141.6,180.9) 141.7,181 v1(242.3,181) ; v1(244.382,78.017) 244.382,83.282 v1(247.1,86)
d27*: J1-8B.3 LVL_GPIO27.3 MCU1.10 R1-38.1 TVS-3V3-4.14 | length 265.7
  Top Layer w0.3: MCU1.10@121.446,53.56 121.446,50.054 125.2,46.3 133.75,46.3 ; R1-38.1@133.73,46.95 133.75,46.93 133.75,46.3 ; v1(163.9,118.4) 163.738,118.4 163.437,118.7 159.4,118.7 155.7,115 155.7,108.5 165.1,99.1 168.5,99.1 169.276,98.324 TVS-3V3-4.14@169.276,97 169.276,95.376 v1(169,95.1) ; v1(168.7,45.6) 168,46.3 133.75,46.3 ; v1(227.791,116.12) 227.791,105.291 226.7,104.2 226.7,97.8 224.5,95.6 224.5,91.3 226.8,89 226.8,81.7 232.1,76.4 232.1,76 v1(231.9,75.8) ; LVL_GPIO27.3@241.4,77.1 242.45,77.1 ; v1(242.4,75.9) 242.4,77.05 242.45,77.1 ; J1-8B.3@243.5,77.1 242.45,77.1
  Bottom Layer w0.3: v1(163.9,118.4) 163.936,118.364 164.536,118.364 167.2,115.7 172.6,115.7 173.6,116.7 227.211,116.7 v1(227.791,116.12) ; v1(168.7,45.6) 168.862,45.6 170,46.738 170,91.9 169,92.9 v1(169,95.1) ; v1(231.9,75.8) 242.3,75.8 v1(242.4,75.9)
D28: GPIO28.1 J1-9B.2 | length 202.5
  Top Layer w0.3: v1(167.9,184.8) 167.921,184.821 167.921,199.115 GPIO28.1@168.221,199.415 ; J1-9B.2@261.5,99.6 265.251,99.6 266.7,101.049 v1(266.7,183.8)
  Bottom Layer w0.3: v1(167.9,184.8) 168.9,183.8 v1(266.7,183.8)
d28*: J1-9B.3 LVL_GPIO28.3 MCU1.15 R1-39.1 TVS-3V3-4.13 | length 261.7
  Top Layer w0.3: MCU1.15@134.146,53.56 134.4,53.306 134.4,52.2 135.7,50.9 135.7,49.49 138.226,46.964 171.324,46.964 171.688,46.6 v1(171.8,46.6) ; v1(162.1,117.6) 159.4,117.6 156.7,114.9 156.7,109 165.5,100.2 169.5,100.2 170.546,99.154 TVS-3V3-4.13@170.546,97 170.696,96.85 170.696,95.604 170.8,95.5 v1(170.8,95.3) ; LVL_GPIO28.3@259.25,98.6 259.25,98.675 259.275,98.7 260.388,98.7 ; J1-9B.3@261.5,98.7 260.388,98.7 ; v1(268.7,110.429) 268.7,100.6 265.4,97.3 260.9,97.3 260.388,97.812 260.388,98.7
  Bottom Layer w0.3: v1(162.1,117.6) 163.2,117.6 166,114.8 172.9,114.8 174,115.9 225.8,115.9 226.8,114.9 229.2,114.9 231.5,117.2 263.5,117.2 268.7,112 v1(268.7,110.429) ; v1(170.8,95.3) 171.3,94.8 171.3,47.1 v1(171.8,46.6)
d29: J1-20.2 MCU1.37 TVS-3V3-4.9 | length 83.4
  Top Layer w0.3: MCU1.37@121.446,68.8 121.446,72.046 129.3,79.9 129.3,81.6 131.9,84.2 158,84.2 160.1,86.3 160.5,86.3 164.8,90.6 164.8,91.7 166.4,93.3 173.7,93.3 175.626,95.226 TVS-3V3-4.9@175.626,97 176.4,97 v1(177.3,96.1)
  Bottom Layer w0.3: J1-20.2@175.913,105.34 176.065,105.187 177.113,105.187 177.9,104.4 177.9,96.773 177.3,96.173 v1(177.3,96.1)
d29_E: H2.11 H3.10 H4.10 J1-20.1 | length 340.2
  Top Layer w0.3: v1(78,2.2) 141.1,2.2 H3.10@143.5,4.6 139.9,4.6 139.2,5.3 139.2,13.1 144.4,18.3 149.9,18.3 158.4,26.8 162.5,26.8 165,24.3 v1(183.3,24.3) 183.3,6.5 187.1,2.7 240,2.7 244.44,7.14 H2.11@248.4,7.14
  Bottom Layer w0.3: H4.10@38.6,4.6 38.313,4.313 38.313,2.687 39.7,1.3 77.1,1.3 v1(78,2.2) ; J1-20.1@175.913,102.8 175.913,50.387 180.9,45.4 180.9,26.7 v1(183.3,24.3)
d30: J1-21.2 MCU1.38 TVS-3V3-4.10 | length 100.2
  Top Layer w0.3: MCU1.38@118.906,68.8 118.906,70.793 128.3,80.187 128.3,81.8 131.5,85 157.7,85 163.7,91 163.7,92.2 165.5,94 173,94 174.356,95.356 TVS-3V3-4.10@174.356,97 174.356,98.256 174.7,98.6 177.1,98.6 179,96.7 179,95.2 v1(177.8,94) ; J1-21.2@172.468,105.34 174.2,103.608 174.2,102.2 175.3,101.1 179.7,101.1 v1(181.4,99.4)
  Bottom Layer w0.3: v1(177.8,94) 178.1,94 181.4,97.3 v1(181.4,99.4)
d30_E: H2.13 H3.9 H4.9 J1-21.1 | length 331.5
  Top Layer w0.254: 252.1,3.1 252.2,3.2 252.2,5.86 H2.13@253.48,7.14
  Top Layer w0.3: H4.9@41.14,4.6 41.1,4.56 41.1,3.5 43.4,1.2 148.8,1.2 ; H3.9@146.04,4.6 146.327,4.313 146.327,3.673 148.8,1.2 ; v1(181.3,20.2) 181.4,20.1 181.4,8.9 173.7,1.2 ; 252.1,3.1 250.2,1.2 173.7,1.2 ; 148.8,1.2 173.7,1.2
  Bottom Layer w0.3: J1-21.1@172.468,102.8 172.5,102.768 172.5,101.6 174.6,99.5 174.6,50 179.9,44.7 179.9,24.6 181.3,23.2 v1(181.3,20.2)
d31: J1-22.2 MCU1.35 TVS-3V3-4.12 | length 95.7
  Top Layer w0.3: MCU1.35@126.526,68.8 126.526,74.426 131.5,79.4 131.5,81.3 132.7,82.5 160.2,82.5 165.9,88.2 179,88.2 180.8,90 180.8,97.7 178.5,100 173.4,100 171.85,98.45 ; J1-22.2@169.024,105.34 169.348,105.34 169.989,104.7 170.4,104.7 170.7,104.4 170.7,101.1 171.85,99.95 171.85,98.45 ; TVS-3V3-4.12@171.816,97 171.85,97.034 171.85,98.45
d31_E: H3.3 H4.3 J1-22.1 | length 261.2
  Top Layer w0.3: H4.3@56.38,4.6 56.38,4.42 58.2,2.6 72.7,2.6 74.3,4.2 129.1,4.2 136.8,11.9 136.8,13.6 143.6,20.4 148.8,20.4 152.4,24 v1(152.4,24.9) ; H3.3@161.28,4.6 161.567,4.313 161.567,3.333 161.9,3 171.9,3 174.5,5.6 174.5,18.9 177.8,22.2 v1(179.1,22.2)
  Bottom Layer w0.3: v1(152.4,24.9) 154,23.3 167.2,23.3 172.5,18 179.1,18 179.3,18.2 179.3,22.2 v1@179.2,22.3 ; J1-22.1@169.024,102.8 173.4,98.424 173.4,49.8 178.7,44.5 178.7,23.363 178.7,23.252 cw(c178.4,23.252) 178.7,23.25 cw(c178.011,22.561) v1@178.985,22.561 ; v1@178.985,22.56 178.985,22.315 v1(179.1,22.2)
d32: J1-23.2 MCU1.36 TVS-3V3-4.11 | length 117.5
  Top Layer w0.3: MCU1.36@123.986,68.8 123.986,73.186 130.5,79.7 130.5,81.3 132.5,83.3 158.6,83.3 160.9,85.6 161.7,85.6 165.2,89.1 178.8,89.1 179.8,90.1 179.8,92.1 ; TVS-3V3-4.11@173.086,97 173.086,98.386 173.9,99.2 177.8,99.2 179.8,97.2 179.8,92.1 ; v1(178.3,92.1) 179.8,92.1
  Bottom Layer w0.3: J1-23.2@165.579,105.34 165.579,105.479 166.8,106.7 178.3,106.7 180.3,104.7 180.3,102.5 182.5,100.3 182.5,96.3 v1(178.3,92.1)
d32_E: H3.4 H4.4 J1-23.1 | length 263.8
  Top Layer w0.3: H4.4@53.84,4.6 53.84,3.06 55,1.9 73.6,1.9 74.8,3.1 129.463,3.1 137.8,11.437 137.8,13.3 143.8,19.3 149.2,19.3 156.3,26.4 156.3,26.654 v1(156.258,26.696) ; H3.4@158.74,4.6 158.75,4.59 158.75,3.25 159.8,2.2 172.7,2.2 175.8,5.3 175.8,17.4 v1(177.6,19.2)
  Bottom Layer w0.3: v1(156.258,26.696) 158.754,24.2 167.8,24.2 172.8,19.2 v1(177.6,19.2) 177.6,44.2 172.4,49.4 172.4,95.9 165.579,102.721 J1-23.1@165.579,102.8
DAC_1: DAC-1.4 J1-16.2 TVS-3V3-3.16 | length 21.2
  Top Layer w0.3: DAC-1.4@141.146,96.8 144.5,96.8 145.5,97.8 ; TVS-3V3-3.16@142.886,107.3 142.886,106.6 145.5,103.986 145.5,97.8 ; J1-16.2@150.106,96.2 149.9,96.406 149.9,97.4 149.5,97.8 145.5,97.8
DAC_1_E: H1.16 J1-16.3 | length 171.8
  Top Layer w0.3: v1(164.8,70.1) 164.915,69.985 165.315,69.985 165.8,69.5 197.9,69.5 212.2,55.2 276.1,55.2 291.497,39.803 H1.16@292.881,39.803
  Bottom Layer w0.3: J1-16.3@152.646,96.2 152.646,91.954 164.8,79.8 v1(164.8,70.1)
DAC_1_S: DAC1.1 J1-16.1 | length 147.1
  Top Layer w0.3: DAC1.1@84.65,132.246 84.65,131.15 85.5,130.3 90,130.3 93.9,134.2 v1(93.9,143.6) ; J1-16.1@147.566,96.2 149.766,94 154.1,94 156.6,96.5 156.6,102.9 151.2,108.3 151.2,119.5 156.6,124.9 156.6,143.2 v1(155.8,144)
  Bottom Layer w0.3: v1(93.9,143.6) 94.3,144 v1(155.8,144)
DAC_2: DAC-1.13 J1-17.2 TVS-3V3-3.9 | length 22.6
  Top Layer w0.3: J1-17.2@126.306,96.2 126.402,96.296 126.402,98.102 127.7,99.4 131,99.4 ; TVS-3V3-3.9@133.996,107.3 133.996,106.6 132.721,105.325 132.325,105.325 131,104 131,99.4 ; DAC-1.13@135.346,96.8 132.311,96.8 131,98.111 131,99.4
DAC_2_E: H2.20 J1-17.3 | length 221.2
  Top Layer w0.3: v1(158.4,71.8) 158.8,72.2 169.6,72.2 170,71.8 198.1,71.8 213.1,56.8 224.6,56.8 225.2,57.4 230,57.4 v1(230.8,56.6) ; v1(223.4,19.9) 224.3,19 261,19 271.26,8.74 H2.20@271.26,7.14
  Bottom Layer w0.3: J1-17.3@128.846,96.2 128.846,94.254 129.9,93.2 133.1,93.2 136.5,96.6 139.4,96.6 141.3,94.7 141.3,92.1 158.4,75 v1(158.4,71.8) ; v1(223.4,19.9) 222.7,20.6 222.7,48.9 230.4,56.6 v1(230.8,56.6)
DAC_2_S: DAC2.1 J1-17.1 | length 56
  Top Layer w0.3: v1(111.3,132.2) 112.461,132.2 DAC2.1@112.507,132.246 ; J1-17.1@123.766,96.2 121.6,98.366 121.6,101.7 127.2,107.3 127.2,131.6 v1(126.8,132)
  Bottom Layer w0.3: v1(111.3,132.2) 111.5,132 v1(126.8,132)
DAC_3: DAC-1.5 J1-18.2 TVS-3V3-3.15 | length 30.1
  Top Layer w0.3: DAC-1.5@141.146,97.45 143.75,97.45 144.8,98.5 144.8,103.2 142.7,105.3 142.2,105.3 141.7,105.8 141.7,107.216 TVS-3V3-3.15@141.616,107.3 141.616,108.816 141.9,109.1 145.9,109.1 150.106,104.894 J1-18.2@150.106,101.2
DAC_3_E: H2.19 J1-18.3 | length 197.7
  Top Layer w0.3: v1(166.4,71) 197.6,71 212.6,56 227.224,56 227.624,56.4 v1@227.7,56.4 ; v1(222.6,18) 260.3,18 268.72,9.58 H2.19@268.72,7.14
  Bottom Layer w0.3: J1-18.3@152.646,101.2 154.7,99.146 154.7,91.8 166.4,80.1 v1(166.4,71) ; v1(222.6,18) 222.6,18.1 220.9,19.8 220.9,50 227.064,56.164 227.664,56.164 v1(227.7,56.2)
DAC_3_S: DAC3.1 J1-18.1 | length 61
  Top Layer w0.3: DAC3.1@140.364,132.246 140.4,132.21 v1(140.4,131.5) ; J1-18.1@147.566,101.2 147.796,100.97 147.796,100.004 148.5,99.3 154.3,99.3 155,100 155,102.1 149.3,107.8 149.3,119.9 155,125.6 155,131.3 v1(154.2,132.1)
  Bottom Layer w0.3: v1(140.4,131.5) 141,132.1 v1(154.2,132.1)
DAC_4: DAC-1.12 J1-19.2 TVS-3V3-3.10 | length 29.5
  Top Layer w0.3: J1-19.2@126.346,101.2 130.9,105.754 130.9,107.4 132.5,109 135.09,109 135.266,108.824 TVS-3V3-3.10@135.266,107.3 135.266,105.576 135.09,105.4 134.2,105.4 131.9,103.1 131.9,98.2 132.65,97.45 DAC-1.12@135.346,97.45
DAC_4_E: H3.5 H4.5 J1-19.3 | length 247.1
  Top Layer w0.254: 154.908,5.892 H3.5@156.2,4.6 ; 154.928,5.892 154.928,8.092
  Top Layer w0.3: 154.9,8.1 154.91,8.11 154.91,18.11 161.585,24.785 161.585,25.485 v1(161.7,25.6)
  Bottom Layer w0.254: H4.5@51.3,4.6 51.3,2.9 51.8,2.4 75.9,2.4 76.9,3.4 79.2,3.4 81.6,1 153.6,1 155.919,3.319 155.919,4.319 H3.5@156.2,4.6
  Bottom Layer w0.3: J1-19.3@128.886,101.2 131.286,103.6 152.7,103.6 156.6,99.7 156.6,92.2 168.8,80 168.8,48.8 165.8,45.8 165.8,29.7 v1(161.7,25.6)
DAC_4_S: DAC4.1 J1-19.1 | length 89.3
  Top Layer w0.3: J1-19.1@123.806,101.2 129.6,106.994 129.6,141.9 v1(129.8,142.1) ; v1(162,141.5) 163.8,139.7 163.8,133.8 165.354,132.246 DAC4.1@168.221,132.246
  Bottom Layer w0.3: v1(129.8,142.1) 161.4,142.1 v1(162,141.5)
DAC_5: DAC5.1 DAC-1.6 TVS-3V3-3.14 | length 115.5
  Top Layer w0.3: DAC-1.6@141.146,98.1 143.2,98.1 144,98.9 144,102.8 142.4,104.4 141.2,104.4 140.346,105.254 TVS-3V3-3.14@140.346,107.3 140.346,108.873 141.473,110 145.3,110 147.9,112.6 147.9,121.3 152.3,125.7 v1(152.3,146.7) ; v1(190.9,142.2) 190.9,134.241 193.541,131.6 195.433,131.6 195.579,131.746 195.779,131.746 196.079,132.046 DAC5.1@196.079,132.246
  Bottom Layer w0.3: v1(152.3,146.7) 186.4,146.7 v1(190.9,142.2)
DAC_6: DAC6.1 DAC-1.11 TVS-3V3-3.11 | length 172.5
  Top Layer w0.3: v1(132.2,151.7) 132.2,151.624 131.8,151.224 131.8,110.176 131.976,110 135.6,110 136.536,109.064 TVS-3V3-3.11@136.536,107.3 136.5,107.264 136.5,105.4 135.8,104.7 134.7,104.7 132.7,102.7 132.7,98.6 133.2,98.1 DAC-1.11@135.346,98.1 ; v1(218.9,151) 218.9,133.4 220.054,132.246 DAC6.1@223.936,132.246
  Bottom Layer w0.3: v1(132.2,151.7) 218.2,151.7 v1(218.9,151)
DAC_7: DAC7.1 DAC-1.7 TVS-3V3-3.13 | length 178.4
  Top Layer w0.3: DAC-1.7@141.146,98.75 142.75,98.75 143.1,99.1 143.1,102.2 142.1,103.2 141,103.2 139.076,105.124 TVS-3V3-3.13@139.076,107.3 139.076,109.476 140.5,110.9 144.3,110.9 146.5,113.1 146.5,122.1 150.9,126.5 150.9,141.7 150.4,142.2 v1(150.4,148.7) ; v1(246.6,149) 246.6,134.8 249.154,132.246 DAC7.1@251.793,132.246
  Bottom Layer w0.3: v1(150.4,148.7) 151.1,149.4 246.2,149.4 v1(246.6,149)
DAC_8: DAC8.1 DAC-1.10 TVS-3V3-3.12 | length 227.8
  Top Layer w0.3: DAC-1.10@135.346,98.75 133.85,98.75 133.4,99.2 133.4,102.3 135.1,104 136.3,104 137.806,105.506 TVS-3V3-3.12@137.806,107.3 137.806,109.594 136.4,111 133.3,111 132.6,111.7 132.6,115.3 135.6,118.3 v1(135.6,153.7) ; v1(270.7,153.7) 270.6,153.6 270.6,136.1 274.454,132.246 DAC8.1@279.65,132.246
  Bottom Layer w0.3: v1(135.6,153.7) v1(270.7,153.7)
DD1: DAC-1.1 MCU1.42 R1-1.1 | length 58.3
  Top Layer w0.3: v1(113.2,86.6) 114.273,86.6 115.773,88.1 139,88.1 141.146,90.246 141.146,92.3 DAC-1.1@141.146,94.85
  Bottom Layer w0.3: MCU1.42@108.746,68.8 103.2,74.346 103.2,76.6 v1(113.2,86.6)
DD2: DAC-1.9 MCU1.41 R1-2.2 | length 56.1
  Top Layer w0.3: v1(110.4,73.6) 110.4,69.965 111.286,69.079 MCU1.41@111.286,68.8 ; v1(116.5,89.4) 116.573,89.4 117.173,88.8 130.8,88.8 131.5,89.5 131.8,89.5 v1(132.9,90.6) R1-2.2@134.3,90.6 ; DAC-1.9@135.346,99.4 136.8,99.4 137.9,98.3 137.9,95.3 v1(137.8,95.2)
  Bottom Layer w0.3: v1(110.4,73.6) 117.5,80.7 117.5,86.7 116.5,87.7 v1(116.5,89.4) ; v1(132.9,90.6) 137.385,95.085 137.685,95.085 v1(137.8,95.2)
dir0: DIR_13=OUT.2 LVL_GPIO13.5 PWM2.6 | length 42.9
  Top Layer w0.3: PWM2.6@229.2,66.2 237.1,66.2 237.4,66.5 v1(251.781,66.5) ; LVL_GPIO13.5@258.95,69.2 258.95,70.65 DIR_13=OUT.2@259.5,71.2 DIR_13=OUT.2@259.2,71.5 ; DIR_13=OUT.2@259,71.7 DIR_13=OUT.2@259.2,71.5 ; v1(259.6,72.3) 259.6,71.7 259.4,71.5 DIR_13=OUT.2@259.2,71.5
  Bottom Layer w0.3: v1(251.781,66.5) 254.7,66.5 256.1,65.1 259.3,65.1 260.5,66.3 260.5,69.6 259.9,70.2 259.9,72 v1(259.6,72.3)
dir1: DIR_25=OUT.2 LVL_GPIO25.5 PWM2.8 | length 62.1
  Top Layer w0.3: PWM2.8@229.2,67.5 235.2,67.5 238.1,70.4 238.1,74.5 229.3,83.3 229.3,102.7 v1(229.4,102.8) ; v1(240.5,103.8) 240.615,103.685 240.815,103.685 DIR_25=OUT.2@241.4,103.1 240.8,102.5 LVL_GPIO25.5@240.8,100.8
  Bottom Layer w0.3: v1(229.4,102.8) 231.2,104.6 239.7,104.6 v1(240.5,103.8)
dir2: DIR_26=OUT.2 LVL_GPIO26.5 PWM2.10 | length 53.7
  Top Layer w0.3: v1(226.8,94.4) 228.1,93.1 228.1,82.4 236.2,74.3 236.2,70.5 234.5,68.8 PWM2.10@229.2,68.8 ; v1(239.5,94.8) 239.615,94.685 239.915,94.685 DIR_26=OUT.2@241.4,93.2 240.75,92.55 LVL_GPIO26.5@240.75,90.7
  Bottom Layer w0.3: v1(226.8,94.4) 239.1,94.4 v1(239.5,94.8)
dir3: DIR_27=OUT.2 LVL_GPIO27.5 PWM2.12 | length 32.3
  Top Layer w0.3: PWM2.12@229.2,70.1 233.4,70.1 v1(233.9,70.6) ; LVL_GPIO27.5@240.75,79.3 240.763,79.312 240.763,80.35 241.5,81.087 DIR_27=OUT.2@241.5,82.2 241.7,82 242.388,81.312 242.388,81.112 242.6,80.9 243.6,80.9 245.8,78.7 245.8,75.73 243.4,73.33 v1(243.4,71.1)
  Bottom Layer w0.3: v1(233.9,70.6) 242.9,70.6 v1(243.4,71.1)
dir4: DIR_28=OUT.2 LVL_GPIO28.5 PWM2.15 | length 57.1
  Top Layer w0.3: PWM2.15@222.8,71.4 222.8,76.08 224.771,78.051 225.12,78.051 v1(225.234,78.166) ; LVL_GPIO28.5@258.6,100.8 258.6,102 259.1,102.5 259.1,103 DIR_28=OUT.2@259.5,103.4 v1(259.5,104.4)
  Bottom Layer w0.3: v1(225.234,78.166) 246.469,99.4 251.7,99.4 256.7,104.4 v1(259.5,104.4)
dir5: DIR_31=OUT.2 LVL_GPIO31.5 PWM2.17 | length 51.8
  Top Layer w0.3: PWM2.17@222.8,70.1 224.338,70.1 225.3,71.062 225.3,74.4 v1(226.2,75.3) ; LVL_GPIO31.5@258.5,90.7 258.5,91.825 258.7,92.025 258.7,92.7 DIR_31=OUT.2@259.2,93.2 258.8,93.6 v1(258.8,94.1)
  Bottom Layer w0.3: v1(226.2,75.3) 245,94.1 v1(258.8,94.1)
dir6: DIR_32=OUT.2 LVL_GPIO32.5 PWM2.19 | length 47.5
  Top Layer w0.3: PWM2.19@222.8,68.8 224.9,68.8 226.5,70.4 226.5,72.4 228.4,74.3 v1(229.7,74.3) ; LVL_GPIO32.5@258.5,79.3 258.5,81.5 DIR_32=OUT.2@259.1,82.1 258.8,82.4 v1(258.8,83.2)
  Bottom Layer w0.3: v1(229.7,74.3) 250,74.3 258.8,83.1 v1(258.8,83.2)
DSpare: F6.2 J1-1.1 | length 2.2
  Top Layer w0.3: F6.2@263.9,64.2 264,64.3 J1-1.1@264,66.4
en0: LVL_GPIO13.1 PWM2.7 | length 31.2
  Top Layer w0.3: PWM2.7@229.2,66.85 236.55,66.85 237.4,67.7 251,67.7 v1(251.8,68.5) ; v1(258,66.4) 258.125,66.4 258.3,66.575 LVL_GPIO13.1@258.3,67
  Bottom Layer w0.3: v1(251.8,68.5) 255.9,68.5 v1(258,66.4)
en1: LVL_GPIO25.1 PWM2.9 | length 57.2
  Top Layer w0.3: v1(227.7,99.9) 227.7,99.8 228.7,98.8 228.7,82.8 237.3,74.2 237.3,70.6 234.85,68.15 PWM2.9@229.2,68.15 ; v1(240.1,97.3) 240.1,98.075 240.125,98.1 240.125,98.575 LVL_GPIO25.1@240.15,98.6
  Bottom Layer w0.3: v1(227.7,99.9) 237.5,99.9 v1(240.1,97.3)